# Altium PCB Brojilo_zaslon.PcbDoc
Units mm, origin at the board's own origin, x right, y up, seen from the top; angles counter-clockwise.
Board outline 113 x 60 mm, 2 copper layers (Top Layer, Bottom Layer); 32 components, 61 nets, 227 pads, 0 vias.
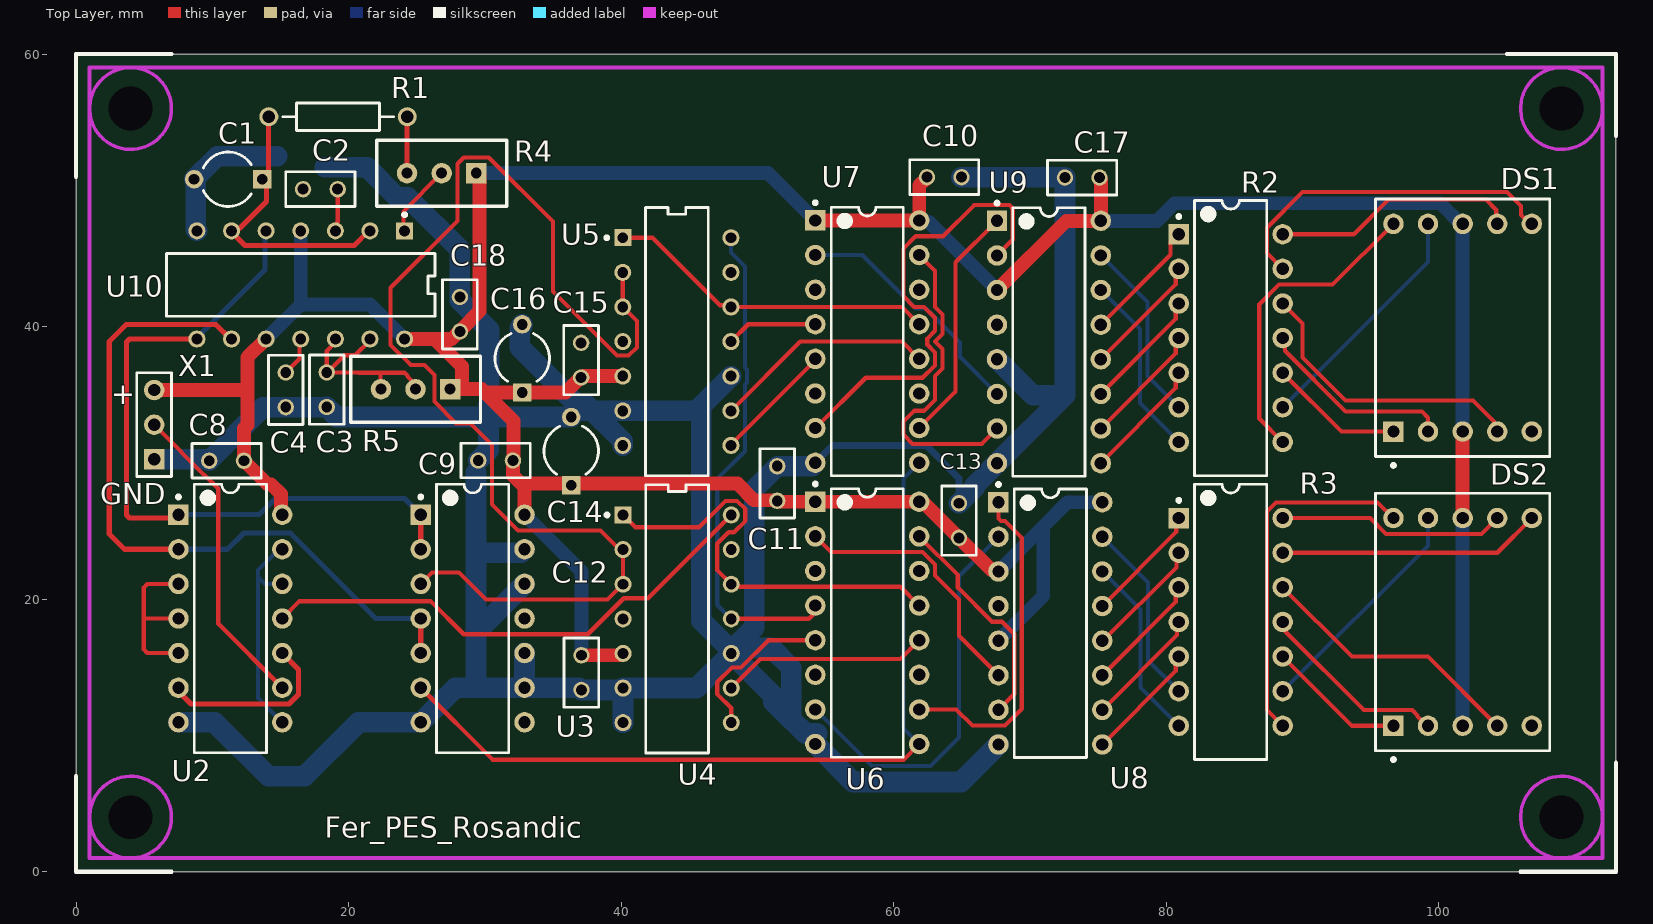
[diagram p0: Top Layer view]
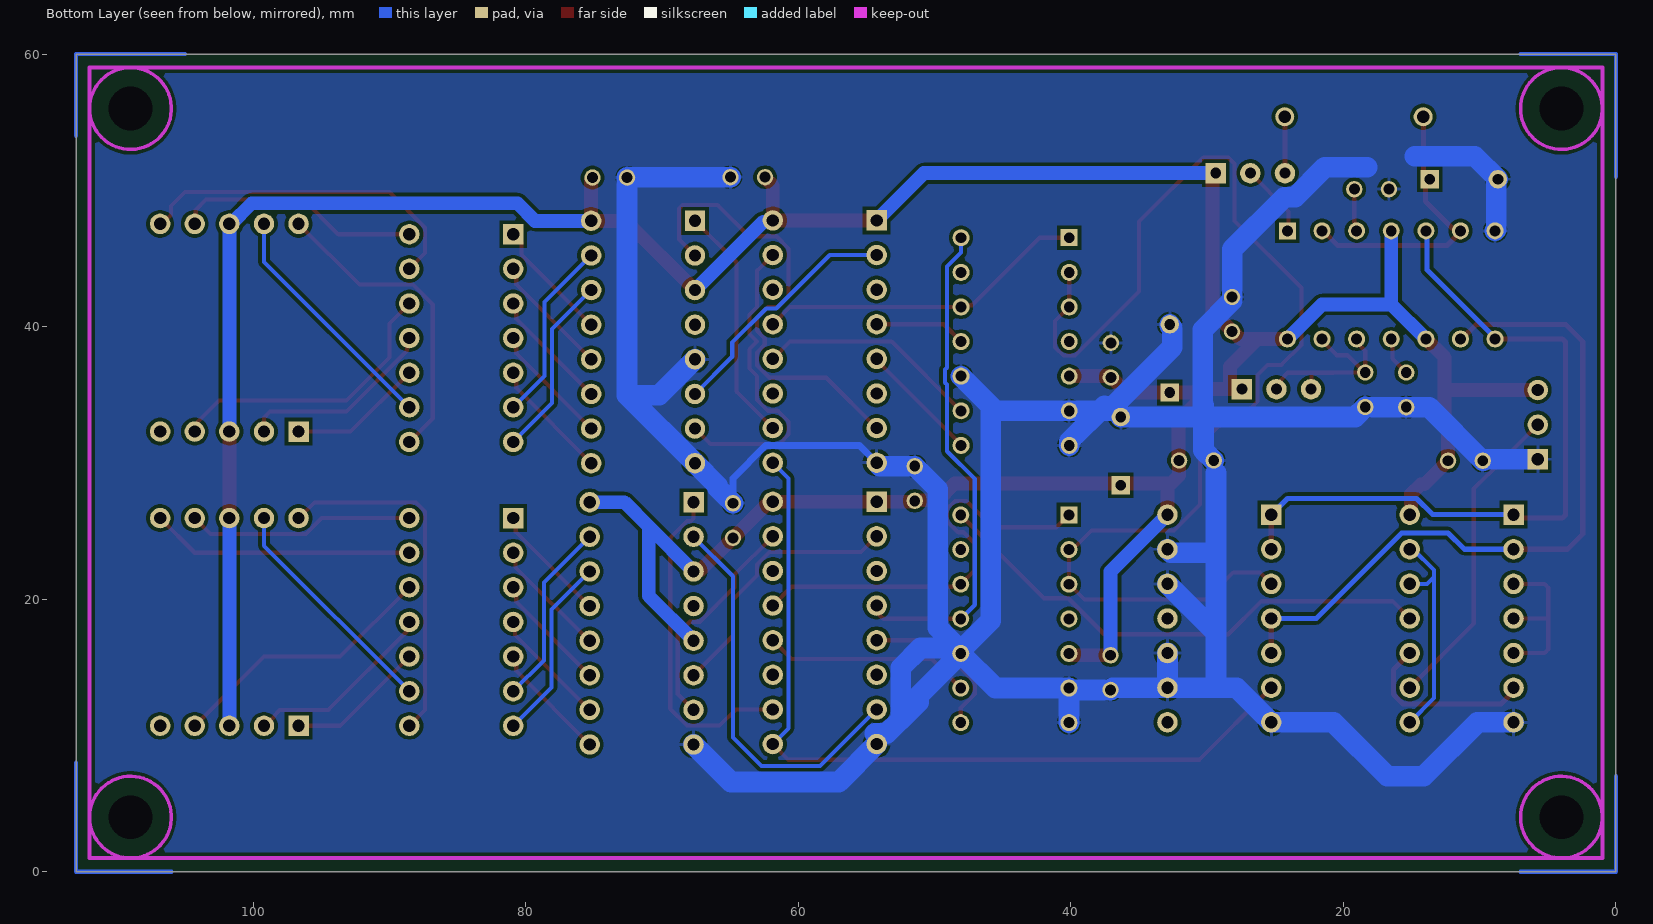
[diagram p1: Bottom Layer view, seen from below]

## Layer stack, top to bottom
Top Solder: solder mask 0.0102, Solder Resist, Dk 3.5
Top Layer: signal copper 0.0356
Dielectric 1: dielectric 0.32, FR-4, Dk 4.8
Bottom Layer: signal copper 0.0356
Bottom Solder: solder mask 0.0102, Solder Resist, Dk 3.5

## Board outline
0,0 0,60 113,60 113,0

## Design rules (kind name [scope] priority, off if disabled: settings)
Clearance [All] p1: gap=0.254 ignorepadtopadclearanceinfootprint=FALSE
HoleSize [All] p1: absolutevalues=TRUE maxlimit=3.2 minlimit=0.5 maxpercent=80.000 minpercent=20.000
PolygonConnect [All] p1: thpad.connectstyle=Relief thpad.reliefconductorwidth=0.254 thpad.reliefentries=4 thpad.polygonreliefangle="90 Angle" thpad.airgapwidth=0.254 smdpad.connectstyle=Relief smdpad.reliefconductorwidth=0.254 smdpad.reliefentries=4 smdpad.polygonreliefangle="90 Angle" smdpad.airgapwidth=0.254 via.connectstyle=Direct via.reliefconductorwidth=0.254 via.reliefentries=4 via.polygonreliefangle="90 Angle" via.airgapwidth=0.254
RoutingVias [All] p1: holewidth=0.5 width=0.7 viastyle="Through Hole" minholewidth=0.5 minwidth=0.7 maxholewidth=0.5 maxwidth=0.7
SilkToSolderMaskClearance SilkToSolderMaskClearance_1 [IsPad] p1: minsilkscreentomaskgap=0.203 clearancetoexposedcopper=TRUE
SilkToSolderMaskClearance [All] p2: minsilkscreentomaskgap=0.254 clearancetoexposedcopper=TRUE
SolderMaskExpansion [All] p1: expansion=0.102 istentingtop=FALSE
SupplyNets "Schematic Supply Nets_1" [InNet('GND')] p1: voltage=0.000
SupplyNets "Schematic Supply Nets" [InNet('+5V')] p2: voltage=0.000
Width [All] p1: maxlimit=1.524 minlimit=0.254 preferedwidth=0.305
28 further rules are at their usual default settings.

## Components (designator, comment, footprint, x,y, rotation, side; value= is the part's Value field where it differs from the comment)
C1 "10u/16V" CAPR5-4x5 11.168,50.812 r180 top
C2 "10n" RAD-0.1 17.931,50.082 r0 top
C3 "0.47u" RAD-0.1 18.4,35.369 r270 top
C4 "10n" RAD-0.1 15.392,35.357 r90 top
C8 "100n" RAD-0.1 11.049,30.154 r0 top
C9 "100n" RAD-0.1 30.785,30.175 r0 top
C10 "100n" RAD-0.1 63.708,50.964 r180 top
C11 "100n" RAD-0.1 51.456,28.486 r270 top
C12 "100n" RAD-0.1 37.085,14.611 r90 top
C13 "100n" RAD-0.1 64.791,25.768 r270 top
C14 "10u/10V" CAPR5-4x5 36.336,30.858 r90 top
C15 "100n" RAD-0.1 37.066,37.537 r270 top
C16 "10u/10V" CAPR5-4x5 32.742,37.666 r90 top
C17 "100n" RAD-0.1 73.832,50.932 r0 top
C18 "100n" RAD-0.1 28.166,40.903 r270 top
DS1 "LT542" H 101.748,39.916 r0 top
DS2 "LT542" H 101.748,18.326 r0 top
R1 "Res2" AXIAL-0.4 19.228,55.397 r0 top
R2 "330" DIP-14 84.73,39.154 r0 top
R3 "330" DIP-14 84.73,18.326 r0 top
R4 "100k" TRIMER 26.829,51.259 r180 top
R5 "100M" TRIMER 24.916,35.41 r180 top
U2 "SN74LS00N" N0014A 11.324,18.58 r0 top
U3 "SN74LS00N" N0014A 29.104,18.58 r0 top
U4 "SN74LS90N" FP-N0014A-MFG 44.109,18.556 r0 top
U5 "SN74LS90N" FP-N0014A-MFG 44.09,38.9 r0 top
U6 "SN74LS175N" N0016A 58.06,18.256 r0 top
U7 "SN74LS175N" N0016A 58.06,38.9 r0 top
U8 "SN7447AN" N0016A 71.497,18.224 r0 top
U9 "SN7447AN" N0016A 71.392,38.868 r0 top
U10 "TLC556IN" FP-N0014A-MFG 16.49,43.058 r270 top
X1 "" HDR1X3 5.736,30.264 r90 top

## Footprints (in the part's own frame and the unit in brackets; to place one, negate y for a bottom-side part, rotate by r counter-clockwise, add the part's x,y. Pads: shape width x height; smd on the part's side, far side on the other; paste and mask are expansions set on the pad)
AXIAL-0.4 [mm] "Axial Device, Thru-Hole; 2 Leads; 0.4 in Pin Spacing"
  round 1.4 hole 0.9: 1(-5.08,0) 2(5.08,0)
  silkscreen extent -4.06,-1.02 4.06,1.02
CAPR5-4x5 [mm] "Capacitor; 2 Leads"
  rect 1.35x1.35 hole 0.8: 1(-2.5,0)
  round 1.35 hole 0.8: 2(2.5,0)
  silkscreen extent -1.69,-2 1.82,2
DIP-14 [mm] "DIP; 14 Leads; Row Spacing 7.62 mm; Pitch 2.54 mm"
  rect 1.5x1.5 hole 0.9: 1(-3.81,7.62)
  round 1.5 hole 0.9: 2(-3.81,5.08) 3(-3.81,2.54) 4(-3.81,0) 5(-3.81,-2.54) 6(-3.81,-5.08) 7(-3.81,-7.62) 8(3.81,-7.62) 9(3.81,-5.08) 10(3.81,-2.54) 11(3.81,0) 12(3.81,2.54) 13(3.81,5.08) 14(3.81,7.62)
  silkscreen extent -3.93,-10.1 2.65,10.1, body extent -3.6,-10.1 3.6,10.1, height 5.08
FP-N0014A-MFG [mm]
  rect 1.25x1.25 hole 0.8 paste-2539.97 mask+0: 1(-3.97,7.62)
  round 1.25 hole 0.8 paste-2539.97 mask+0: 2(-3.97,5.08) 3(-3.97,2.54) 4(-3.97,0) 5(-3.97,-2.54) 6(-3.97,-5.08) 7(-3.97,-7.62) 8(3.97,-7.62) 9(3.97,-5.08) 10(3.97,-2.54) 11(3.97,0) 12(3.97,2.54) 13(3.97,5.08) 14(3.97,7.62)
  silkscreen extent -5.27,-9.84 2.3,9.84, body extent -4.69,-9.94 4.69,9.94, height 0.25
H [mm] "LED, 7-Segment Display, 14.2 mm, RHD; 10 Leads; Row Space 15.24 mm; Pitch 2.54 mm"
  rect 1.5x1.5 hole 0.9: 1(-5.08,-7.62)
  round 1.5 hole 0.9: 2(-2.54,-7.62) 3(0,-7.62) 4(2.54,-7.62) 5(5.08,-7.62) 6(5.08,7.62) 7(2.54,7.62) 8(0,7.62) 9(-2.54,7.62) 10(-5.08,7.62)
  silkscreen extent -6.4,-10.22 6.4,9.45, body extent -6.4,-9.45 6.4,9.45, height 8.25
HDR1X3 [mm] "Connector; Header; 3 Position"
  rect 1.5x1.5 hole 0.9: 1(0,0)
  round 1.5 hole 0.9: 2(2.54,0) 3(5.08,0)
  silkscreen extent -1.27,-1.27 6.35,1.27
N0014A [mm] "DIP, 14-Leads, Body 19.7x6.6mm, Pitch 2.54mm"
  rect 1.5x1.5 hole 0.9: 1(-3.81,7.62)
  round 1.5 hole 0.9: 2(-3.81,5.08) 3(-3.81,2.54) 4(-3.81,0) 5(-3.81,-2.54) 6(-3.81,-5.08) 7(-3.81,-7.62) 8(3.81,-7.62) 9(3.81,-5.08) 10(3.81,-2.54) 11(3.81,0) 12(3.81,2.54) 13(3.81,5.08) 14(3.81,7.62)
  silkscreen extent -3.93,-9.85 2.65,9.85, body extent -3.95,-9.85 3.95,9.85, height 5.08
N0016A [mm] "DIP, 16-Leads, Body 19.7x6.6mm, Pitch 2.54mm"
  rect 1.5x1.5 hole 0.9: 1(-3.81,8.89)
  round 1.5 hole 0.9: 2(-3.81,6.35) 3(-3.81,3.81) 4(-3.81,1.27) 5(-3.81,-1.27) 6(-3.81,-3.81) 7(-3.81,-6.35) 8(-3.81,-8.89) 9(3.81,-8.89) 10(3.81,-6.35) 11(3.81,-3.81) 12(3.81,-1.27) 13(3.81,1.27) 14(3.81,3.81) 15(3.81,6.35) 16(3.81,8.89)
  silkscreen extent -3.93,-9.85 2.65,10.31, body extent -3.95,-9.85 3.95,9.85, height 5.08
RAD-0.1 [mm] "Radial Cap, Thru-Hole; 2 Leads; 0.1 in Pin Spacing"
  round 1.2 hole 0.8: 1(-1.27,0) 2(1.27,0)
  silkscreen extent -2.54,-1.27 2.54,1.27
TRIMER [mm]
  rect 1.5x1.5 hole 0.8: 1(-2.54,0)
  round 1.5 hole 0.8: 2(0,0) 3(2.54,0)
  silkscreen extent -4.77,-2.41 4.76,2.42

## Part data
C1 C14 C16: library part Elko, Dobavljac=DigiKey
  C1: Cijena=€0,34, Kataloški broj=P14391-ND, Kućište="10x12.5mm; 2 izvoda; pitch 5.0mm; žičani izvodi", Opis="Elektrolitski kondenzator 10u/16V", Proizvođač="Panasonic Electronic Components", Vrijednost=10u/16V
  C14 C16: Cijena=€0,18, Kataloški broj=399-ESK106M010AC3AA-ND, Kućište="5x11mm; 2 izvoda; pitch 2.0mm; žičani izvodi", Opis="Elektrolitski kondenzator 10u/10V", Proizvođač=KEMET, Vrijednost=10u/10V
C2 C3 C4 C8 C9 C10 C11 C12 C13 C15 C17 C18: library part Cap, "Capacitor", Dobavljac=DigiKey, PackageReference=RAD-0.3
  C2 C4: Cijena=€0,21, Kataloški broj=BC5134-ND, Kućište="2.3x4.0mm; 2 izvoda; pitch 5.0mm; žičani izvodi", Opis="Keramički kondenzator 0.01uF", Proizvođač="Vishay Beyschlag/Draloric/BC Components", Vrijednost=0.01uF
  C3: Cijena=€0,18, Kataloški broj=445-173587-3-ND, Kućište=0805, Opis="Keramički kondenzator 0.47uF", Proizvođač=TDK, Vrijednost=0.47uF
  C8 C9 C10 C11 C12 C13 C15 C17 C18: Cijena=€0,23, Kataloški broj=BC3324-ND, Kućište="2.3x6.0mm; 2 izvoda; pitch 7.5mm; žičani izvodi", Opis="Keramički kondenzator 100nF", Proizvođač="Vishay Beyschlag/Draloric/BC Components", Vrijednost=100nF
DS1 DS2: library part "Dpy Blue-CA", "14.2 mm General Purpose Blue 7-Segment Display: CA, RH DP, Gray Surface", Cijena=€1,90, Dobavljac=DigiKey, Kataloški broj=754-2281-ND, Kućište=0603, Opis="7-segmentni zaslon", Proizvođač=Kingbright
R1: "Resistor", Cijena=€0,09, Dobavljac=DigiKey, Kataloški broj=1.00KXBK-ND, Kućište="2.5x6.8mm; 2 izvoda; pitch 10mm; žičani izvodi", Opis="Otpornik 1kOhm", PackageReference=AXIAL-0.4, Proizvođač=YAGEO, Vrijednost=1k
R2 R3: library part "Res Pack4", "Isolated Resistor Network", Cijena=€3,37, Dobavljac=DigiKey, Kataloški broj=4114R-1-331LF-ND, Kućište=DIP-14, Opis="Mreža 7 otpornika 330 Ohm", Proizvođač="Bourns Inc."
R4 R5: library part Trimer, Dobavljac=DigiKey
  R4: Cijena=€3,09, Kataloški broj=3296W-104-ND, Kućište="9.53x4.83x10.03mm; 3 izvoda; pitch 2.54mm; žičani izvodi", Opis="Trimer 100kOhm", Proizvođač="Bourns Inc."
U2 U3: library part CMP-1627-00476-2, "Quad 2-input positive-NAND gates, N0014A, TUBE", Cijena=€0,66, Dobavljac=DigiKey, Kataloški broj=296-1626-ND, Kućište=SOIC-14, Opis="Četverostruka NI (NAND) vrata", Proizvođač="Texas Instruments"
U4 U5: library part SN74LS90, "IC DECADE COUNTER 14-DIP", Cijena=€3,03, Dobavljac=DigiKey, Kataloški broj=296-34031-5-ND, Kućište=SOIC-14, Opis="Dekadsko brojilo", Proizvođač="Texas Instruments"
U6 U7: library part CMP-1616-00100-3, "Quadruple D-Type Flip-Flops With Clear, N0016A, TUBE", Cijena=€1,03, Dobavljac=DigiKey, Kataloški broj=296-1648-5-ND, Kućište=SOIC-16, Opis="4-bitni D flip-flop registar s resetom", Proizvođač="Texas Instruments"
U8 U9: "BCD-to-7-Segment Decoder / Driver, 4.75 to 5.25 V, 0 to 70 degC, 16-pin DIP (N16), Pb-Free (RoHS)", Cijena=€3,83, Dobavljac=DigiKey, Kataloški broj=296-33612-5-ND, Kućište=SOIC-16, Opis="BCD u 7-segmentni dekoder", Proizvođač="Texas Instruments"
U10: "IC OSC TIMER DUAL 2.1MHZ 14-DIP", Cijena=€1,51, Dobavljac=DigiKey, Kataloški broj=296-10344-5-ND, Kućište=SOIC-16, Opis="Sklop za upravljanje vremenom", Proizvođač="Texas Instruments"
X1: library part "Header 3", "Header, 3-Pin", Cijena=€0,28, Dobavljac=DigiKey, Kataloški broj=S1011EC-03-ND, Kućište="7.62x2.54mm; 3 izvoda; pitch 2.54mm; žičani izvodi", Opis="3-pinski konektor", Proizvođač="Sullins Connector Solutions"

## Free pads (board coordinates)
  round 3 hole 3.2 unplated: 0(4,4) 0(4,56) 0(109,4) 0(109,56)

## Nets (pads, with @x,y where several pads share a name; then routed paths per layer and width w, separated by ;. In a path a pad name is that pad's centre, name@x,y a point inside that pad or via, vN(x,y) a via of type N, cw(c..) or ccw(c..) an arc to the next point about the centre after c; other vN are vias at no path point)
+5V: C8.2 C9.2 C10.2 C11.2 C12.2 C13.2 C14.1 C15.2 C16.1 C17.2 C18.2 DS1.3 DS1.8 DS2.3 DS2.8 R4.1 R5.1 U2.14 U3.14 U4.5 U5.5 U6.1 U6.16 U7.1 U7.16 U8.3 U8.5 U8.16 U9.3 U9.16 U10.4 U10.10 U10.14 X1.3 | length 278.7
  Top Layer w1.016: X1.3 12.594,35.344 ; U10.10 13.927,39.088 12.594,37.755 12.594,35.344 ; U2.14 15.041,26.293 15.041,27.707 14.318,28.43 14.042,28.43 C8.2 12.319,32.511 12.594,32.786 12.594,35.344 ; U10.14 26.292,39.088 ; R5.1 28.317,35.41 ; R4.1 29.611,51.017 29.611,41.128 28.166,39.683 C18.2 28.116,39.633 27.571,39.088 26.292,39.088 ; U3.14@32.914,26.27 32.914,28.473 ; C15.2 37.016,36.267 35.915,35.166 C16.1 30.011,35.166 ; C12.2 39.941,15.881 40.076,16.016 U4.5 ; C15.2@37.116,36.267 37.214,36.366 40.012,36.366 U5.5@40.012,36.36 ; U7.1 U7.16 61.87,50.346 62.438,50.914 C10.2 ; U9.3 72.662,47.758 U9.16 75.202,50.783 75.102,50.883 C17.2 ; U8.3 67.594,22.127 67.162,22.127 C13.2 62.236,27.053 61.963,27.053 U6.16 U6.1 51.576,27.146 51.506,27.216 C11.2 51.421,27.251 49.756,27.251 48.534,28.473 36.336,28.473 32.914,28.473 ; DS2.8 DS1.3 ; 26.292,39.088 28.317,37.064 28.317,35.41 ; 28.317,35.41 29.767,35.41 30.011,35.166 ; 30.011,35.166 32.09,33.086 32.09,30.21 C9.2 32.055,29.069 32.65,28.473 32.914,28.473
  Bottom Layer w1.016: U10.10 16.49,41.628 ; U10.4 16.49,41.628 ; U10.14 21.57,41.628 16.49,41.628 ; R4.1 50.781,51.259 U7.1 ; U3.14 37.085,22.029 C12.2 ; U7.16 61.963,47.697 62.563,47.697 U9.3 ; U8.5 70.976,20.244 ; U8.3 70.976,25.324 ; 70.934,20.286 70.976,20.244 ; U9.16 79.327,47.758 80.616,49.048 100.105,49.048 101.617,47.536 DS1.8 DS1.3 ; U8.16 72.767,27.114 70.976,25.324 ; DS2.3 DS2.8 ; 70.976,20.244 70.976,25.324
CLK: U3.6 U6.9 U7.9 | length 60.8
  Top Layer w0.305: U3.6 30.584,8.21 60.714,8.21 U6.9
  Bottom Layer w0.305: U6.9 60.714,10.522 60.714,28.854 U7.9
CLKA: U4.11 U5.14 U6.4 | length 36.6
  Top Layer w0.305: U4.11 53.765,18.556 54.021,18.812 54.021,19.297 U6.4
  Bottom Layer w0.305: U5.14 48.061,45.438 49.091,44.407 49.091,36.981 49.228,36.844 49.228,35.876 49.091,35.739 49.091,30.853 47.048,28.809 47.048,19.587 U4.11
GateOut: U2.11 U4.14 | length 38.1
  Top Layer w0.305: U2.11 16.404,19.85 26.023,19.85 28.45,17.424 37.548,17.424 40.189,20.065 41.968,20.065 U4.14
GND: C1.2 C2.1 C3.2 C4.1 C8.1 C9.1 C10.1 C11.1 C12.1 C13.1 C14.2 C15.1 C16.2 C17.1 C18.1 U2.7 U3.7 U3.9 U3.10 U3.12 U3.13 U4.6 U4.7 U4.10 U5.6 U5.7 U5.10 U6.8 U7.8 U8.8 U9.5 U9.8 U10.7 X1.1 | length 297.2
  Bottom Layer w0.508: U7.8 55.508,31.268 62.391,31.268 64.791,28.868 C13.1
  Bottom Layer w1.524: X1.1 9.615,30.264 9.725,30.154 C8.1 13.712,34.087 C4.1 17.389,34.087 17.402,34.074 18.375,34.074 C3.2 19.14,33.358 30.257,33.358 ; U2.7 10.161,10.96 14.115,7.006 16.762,7.006 20.716,10.96 U3.7 27.834,13.5 29.358,13.5 ; U10.7 8.784,47.114 8.784,50.696 C1.2 10.359,52.503 14.764,52.503 ; 18.277,51.698 21.352,51.698 23.557,49.493 24.332,49.493 28.166,45.659 C18.1 28.166,41.918 30.325,39.76 30.325,34.301 30.257,34.234 30.257,33.358 ; 29.358,29.255 29.358,23.409 ; C9.1 30.257,30.918 30.257,33.358 ; 29.515,33.358 C14.2 ; C16.2 32.742,40.082 32.553,39.893 32.553,38.495 37.17,33.878 37.17,33.82 U5.6 45.52,33.82 46.115,34.415 U5.10 ; U3.10 U3.9 ; U3.12 29.358,17.564 ; U3.13 32.663,23.409 29.358,23.409 ; 37.527,34.177 40.12,31.584 U5.7 ; U4.7 U4.6 ; 45.88,33.82 45.88,18.435 47.892,16.422 51.03,16.422 52.484,14.968 52.484,11.174 53.519,10.14 54.364,10.14 ; 52.463,11.153 51.165,12.451 51.165,12.931 U4.10 ; U7.8@53.996,29.756 C11.1 49.768,28.068 49.768,17.924 48.079,16.235 U4.10 ; U6.8 57.025,6.591 64.943,6.591 U8.8 ; C13.1 65.921,28.168 65.921,28.317 U9.8 72.562,34.959 ; C10.1 72.531,50.964 C17.1 72.562,34.959 ; U9.5 70.222,34.959 72.562,34.959 ; 29.358,13.5 29.358,17.564 ; 29.358,13.5 U3.9 ; 29.358,17.564 29.358,23.409 ; U3.9 36.926,13.5 C12.1 40.004,13.341 U4.6 ; U4.6 45.539,13.476 U4.10
NetC1_1: C1.1 R1.1 U10.2 U10.6 | length 21.1
  Top Layer w0.381: R1.1@14.118,55.41 14.118,51.262 C1.1 13.988,50.492 13.988,49.184 11.998,47.194 11.576,47.194 U10.6 11.41,46.942 12.394,45.959 20.415,45.959 21.484,47.028 U10.2
NetC2_2: C2.2 U10.3 | length 3.1
  Top Layer w0.305: U10.3 19.125,47.123 19.125,47.603 19.201,47.679 C2.2
NetC3_1: C3.1 R5.2 R5.3 U10.12 U10.13 | length 15.4
  Top Layer w0.305: U10.12 19.03,38.832 18.4,38.202 C3.1 ; U10.13 21.57,38.98 20.485,37.895 19.693,37.895 18.438,36.639 C3.1 ; R5.3 22.337,35.449 22.337,36.614 ; R5.2 24.916,35.733 24.316,36.333 24.316,36.398 24.1,36.614 22.337,36.614 ; C3.1 20.73,36.639 20.755,36.614 22.337,36.614
NetC4_2: C4.2 U10.11 | length 2.9
  Top Layer w0.305: C4.2 16.404,37.638 16.404,39.002 U10.11
NetDS1_1: DS1.1 R2.10 | length 9.9
  Top Layer w0.305: R2.10 92.858,32.296 DS1.1
NetDS1_2: DS1.2 R2.11 | length 14.6
  Top Layer w0.305: R2.11 88.708,38.986 88.708,38.224 93.167,33.765 98.755,33.765 99.208,33.312 DS1.2
NetDS1_4: DS1.4 R2.12 | length 21.4
  Top Layer w0.305: R2.12 90,40.234 90,37.722 93.14,34.582 102.51,34.582 104.059,33.033 104.059,32.525 DS1.4
NetDS1_6: DS1.6 R2.13 | length 25.4
  Top Layer w0.305: R2.13 87.384,45.39 87.384,47.253 90.003,49.873 104.999,49.873 106.028,48.844 106.028,48.189 106.681,47.536 DS1.6
NetDS1_7: DS1.7 R2.14 | length 18.1
  Top Layer w0.305: R2.14 93.763,46.774 96.303,49.314 103.459,49.314 104.214,48.559 104.214,47.61 DS1.7
NetDS1_9: DS1.9 R2.9 | length 17.9
  Bottom Layer w0.305: R2.9 99.208,44.742 DS1.9
NetDS1_10: DS1.10 R2.8 | length 23.1
  Top Layer w0.305: R2.8 86.825,33.249 86.825,41.614 88.288,43.078 92.21,43.078 DS1.10
NetDS2_1: DS2.1 R3.10 | length 10.2
  Top Layer w0.305: R3.10 93.62,10.706 DS2.1
NetDS2_2: DS2.2 R3.11 | length 14.2
  Top Layer w0.305: R3.11 88.769,18.097 88.769,17.589 94.496,11.862 98.052,11.862 98.446,11.468 98.446,11.399 99.139,10.706 DS2.2
NetDS2_4: DS2.4 R3.12 | length 20
  Top Layer w0.305: R3.12 93.62,15.786 99.208,15.786 DS2.4
NetDS2_6: DS2.6 R3.13 | length 19.3
  Top Layer w0.305: R3.13 104.288,23.406 DS2.6
NetDS2_7: DS2.7 R3.14 | length 16.7
  Top Layer w0.305: R3.14 94.967,25.946 96.123,24.79 103.132,24.79 DS2.7
NetDS2_9: DS2.9 R3.9 | length 17.1
  Bottom Layer w0.305: R3.9 99.208,23.914 DS2.9
NetDS2_10: DS2.10 R3.8 | length 26.2
  Top Layer w0.305: R3.8 87.384,11.862 87.384,26.425 88.061,27.102 95.512,27.102 DS2.10
NetR1_2: R1.2 R4.3 | length 4.1
  Top Layer w0.381: R4.3 R1.2@24.289,55.399
NetR2_1: R2.1 U9.13 | length 9
  Top Layer w0.305: U9.13 75.202,40.151 80.322,45.272 80.322,46.176 R2.1
NetR2_2: R2.2 U9.12 | length 9
  Top Layer w0.305: U9.12 75.202,37.611 80.691,43.101 80.691,44.005 R2.2
NetR2_3: R2.3 U9.11 | length 9
  Top Layer w0.305: U9.11 75.202,35.071 80.691,40.561 80.691,41.465 R2.3
NetR2_4: R2.4 U9.10 | length 9
  Top Layer w0.305: U9.10 75.202,32.531 80.691,38.021 80.691,38.925 R2.4
NetR2_5: R2.5 U9.9 | length 9
  Top Layer w0.305: U9.9 75.202,29.991 80.691,35.481 80.691,36.385 R2.5
NetR2_6: R2.6 U9.15 | length 13.5
  Bottom Layer w0.305: U9.15 78.62,41.801 78.62,36.374 R2.6
NetR2_7: R2.7 U9.14 | length 13.5
  Bottom Layer w0.305: U9.14 78.061,39.819 78.061,34.393 R2.7
NetR3_1: R3.1 U8.13 | length 8.8
  Top Layer w0.305: U8.13 80.73,24.917 80.73,25.756 R3.1
NetR3_2: R3.2 U8.12 | length 8.8
  Top Layer w0.305: U8.12 75.373,16.954 80.752,22.334 80.752,23.238 R3.2
NetR3_3: R3.3 U8.11 | length 8.8
  Top Layer w0.305: U8.11 80.691,19.799 80.691,20.637 R3.3
NetR3_4: R3.4 U8.10 | length 8.8
  Top Layer w0.305: U8.10 80.79,17.358 80.79,18.196 R3.4
NetR3_5: R3.5 U8.9 | length 8.8
  Top Layer w0.305: U8.9 80.691,14.719 80.691,15.557 R3.5
NetR3_6: R3.6 U8.15 | length 13.7
  Bottom Layer w0.305: U8.15 78.672,21.209 78.672,15.494 R3.6
NetR3_7: R3.7 U8.14 | length 13.7
  Bottom Layer w0.305: U8.14 78.113,19.228 78.113,13.513 R3.7
NetR4_2: R4.2 U10.1 | length 5.4
  Top Layer w0.305: U10.1 24.024,47.114 24.024,48.454 R4.2
NetU2_1: U2.1 U3.1 U3.2 U10.5 U10.8 | length 53.3
  Top Layer w0.381: U2.1 7.26,25.946 3.927,25.946 3.704,26.169 3.704,38.865 3.927,39.088 U10.8 ; U3.2 U3.1
  Bottom Layer w0.381: U2.1 13.445,26.2 14.639,27.395 24.099,27.395 U3.1 ; U10.8 8.87,39.174 13.864,44.168 13.864,46.942 U10.5
NetU2_2: U2.2 U3.4 U3.5 U10.9 | length 53
  Top Layer w0.381: U2.2 3.546,23.66 2.434,24.772 2.434,38.9 3.692,40.158 10.255,40.158 11.324,39.088 U10.9 ; U3.5 U3.4
  Bottom Layer w0.381: U2.2 11.126,23.66 12.32,24.855 15.717,24.855 21.992,18.58 U3.4
NetU2_3: U2.3 U2.4 U2.5 | length 12.4
  Top Layer w0.305: U2.5 5.228,16.04 4.974,16.294 4.974,18.58 ; U2.4 4.974,18.58 ; U2.3 5.228,21.12 4.974,20.866 4.974,18.58
NetU2_6: U2.6 U2.10 | length 13.3
  Top Layer w0.381: U2.6 7.514,13.224 8.433,12.305 15.629,12.305 16.329,13.005 16.329,14.845 U2.10
NetU2_8: U2.8 U2.12 U2.13 | length 16.3
  Bottom Layer w0.305: U2.8 13.356,12.738 13.356,21.628 ; U2.12 13.864,21.12 13.356,21.628 ; U2.13 14.88,23.66 13.356,22.136 13.356,21.628
NetU2_9: U2.9 X1.2 | length 23.2
  Top Layer w0.305: X1.2 7.744,30.796 7.744,30.765 9.362,29.148 9.392,29.148 10.435,28.105 10.435,18.199 U2.9
NetU3_3: U3.3 U4.2 U4.3 U5.2 U5.3 | length 89.9
  Top Layer w0.305: U3.3 26.132,21.958 28.089,21.958 30.083,19.964 39.007,19.964 U4.3 U4.2 39.893,23.636 38.485,25.044 32.435,25.044 30.521,26.957 30.521,31.313 28.932,32.902 27.888,32.902 26.299,34.491 26.299,36.438 25.565,37.173 24.567,37.173 23.079,38.661 23.079,42.852 27.985,47.759 27.985,51.95 28.451,52.415 30.287,52.415 34.99,47.713 34.99,42.571 39.693,37.869 40.547,37.869 41.151,38.473 41.151,40.409 U5.3 U5.2
NetU4_1: U4.1 U4.12 U6.13 | length 31.8
  Top Layer w0.305: U4.1 41.043,25.272 45.717,25.272 47.652,27.207 48.507,27.207 49.111,26.603 49.111,25.749 48.268,24.906 47.891,24.906 47.048,24.063 47.048,22.127 U4.12 ; U4.12 48.262,20.915 48.725,20.915 48.73,20.91 60.486,20.91 U6.13
NetU4_8: U4.8 U6.5 | length 11.9
  Top Layer w0.305: U4.8@48.079,10.937 48.079,12.018 47.048,13.049 47.048,13.903 48.129,14.985 48.798,14.985 50.799,16.986 U6.5
NetU4_9: U4.9 U6.12 | length 15.2
  Top Layer w0.305: U4.9 50.206,15.602 60.486,15.602 U6.12
NetU5_1: U5.1 U5.12 U7.13 | length 24.4
  Top Layer w0.305: U5.1 42.312,46.52 47.266,41.566 47.934,41.566 U5.12 60.6,41.44 U7.13
NetU5_8: U5.8 U7.5 | length 8.9
  Top Layer w0.305: U5.8 48.06,31.36 54.25,37.55 U7.5
NetU5_9: U5.9 U7.12 | length 16.4
  Top Layer w0.305: U5.9 53.14,38.9 60.6,38.9 U7.12
NetU5_11: U5.11 U7.4 | length 6.7
  Top Layer w0.305: U5.11 49.33,40.17 U7.4
NetU6_2: U6.2 U8.6 | length 19.7
  Top Layer w0.305: U6.2 55.406,23.45 62.122,23.45 63.026,22.545 63.026,21.729 64.79,19.965 64.79,17.311 U8.6
NetU6_7: U6.7 U8.2 | length 29.1
  Bottom Layer w0.305: U6.7 58.396,7.76 62.708,7.76 64.79,9.841 64.79,21.678 U8.2
NetU6_10: U6.10 U8.1 | length 24.6
  Top Layer w0.305: U6.10 64.586,11.906 65.774,10.718 68.166,10.718 69.402,11.954 69.402,24.495 68.166,25.731 67.865,25.731 67.687,25.909 U8.1
NetU6_15: U6.15 U8.7 | length 16.5
  Top Layer w0.305: U6.15 64.705,21.771 64.705,20.84 67.208,18.338 67.938,18.338 68.843,17.433 68.843,13.031 U8.7
NetU7_2: U7.2 U9.6 | length 18.2
  Bottom Layer w0.305: U7.2 57.695,45.25 61.618,41.326 62.349,41.326 64.851,38.824 64.851,37.789 U9.6
NetU7_7: U7.7 U9.2 | length 34.5
  Top Layer w0.305: U7.7 57.946,36.246 62.122,36.246 63.026,37.151 63.026,38.109 62.468,38.668 62.468,39.132 63.026,39.691 63.026,40.649 62.235,41.44 61.505,41.44 60.714,42.231 60.714,45.729 61.618,46.634 63.634,46.634 65.915,48.915 68.5,48.915 68.738,48.677 68.738,46.375 U9.2
NetU7_10: U7.10 U9.1 | length 17.6
  Top Layer w0.305: U7.10 64.542,35.222 64.542,44.718 U9.1
NetU7_15: U7.15 U9.7 | length 23.6
  Top Layer w0.305: U7.15 63.026,44.094 63.026,41.439 63.585,40.88 63.585,39.46 63.026,38.901 63.026,38.899 63.585,38.34 63.585,36.92 63.026,36.361 63.026,34.611 62.235,33.82 61.505,33.82 60.714,33.029 60.714,32.071 61.391,31.394 66.457,31.394 U9.7
pads on no net: DS1.5 DS2.5 U3.8 U3.11 U4.4 U4.13 U5.4 U5.13 U6.3 U6.6 U6.11 U6.14 U7.3 U7.6 U7.11 U7.14 U8.4 U9.4
copper on no net: | length 117.7
  Top Layer w0.254: 0,7 0,0.149 0.149,0 7,0 ; 0,51 0,59.851 0.149,60 7,60 ; 105,60 112.851,60 113,59.851 113,54 ; 106,0 112.851,0 113,0.149 113,8
  Bottom Layer w0.305: 0,7 0,0 7,0 ; 0,51 0,60 7,60 ; 105,60 113,60 113,54 ; 106,0 113,0 113,8

## Polygon pours and split planes (outlines as drawn)
GND on Bottom Layer "NONET_L02_P-001" (solid, remove dead copper, pour order 0): 1,59 112,59 112,1 1,1

## Keep-outs
Keep-Out Layer:
  circle w0.254: c109,4 r3
  circle w0.254: c109,56 r3
  circle w0.254: c4,56 r3
  circle w0.254: c4,4 r3
  lines w0.305: 1,1 1,2 1,59 112,59 112,1 3,1 1,1

## Silkscreen, mask and mechanical layers (free items; w line width, h text height)
Top Overlay:
  lines w0.305: 0,7 0,0 7,0 ; 0,51 0,60 7,60 ; 105,60 113,60 113,54 ; 106,0 113,0 113,8
  text "+" at 2.591,34.315 h1.52
  text "GND" at 1.778,26.949 h1.52
  text "Fer_PES_Rosandic" at 18.254,2.508 h1.52
Mechanical 1:
  the board outline again, w0.305
Drill Drawing:
  lines w0.254: -68.837,74.254 -68.837,75.087 -68.004,75.921 -68.837,76.754 -68.837,77.587 -68.004,77.587 -67.171,76.754 -66.337,77.587 -65.504,77.587 -65.504,76.754 -66.337,75.921 -65.504,75.087 -65.504,74.254 -66.337,74.254 -67.171,75.087 -68.004,74.254 -68.837,74.254 ; -68.837,81.754 -65.504,81.754 -65.504,85.087 -68.837,85.087 -68.837,81.754 ; -68.837,90.087 -68.004,90.087 -67.171,89.254 -66.337,90.087 -65.504,90.087 -66.337,90.921 -65.504,91.754 -66.337,91.754 -67.171,92.587 -68.004,91.754 -68.837,91.754 -68.004,90.921 -68.837,90.087
  lines w1: -71.75,72.004 207.348,72.004 ; -71.75,94.504 207.348,94.504 ; -44.993,64.504 -44.993,102.004 ; -15.493,64.504 -15.493,102.004 ; 41.498,64.504 41.498,102.004 ; 66.004,64.504 66.004,102.004 ; 101.907,64.504 101.907,102.004 ; 176.393,64.504 176.393,102.004 ; -71.75,64.504 207.348,64.504 207.348,102.004 -71.75,102.004 -71.75,64.504
  text "Symbol" at -67.25,96.754 h3.6
  text "Count" at -42.743,96.754 h3.6
  text "Hole Size" at -13.243,96.754 h3.6
  text "Plated" at 43.748,96.754 h3.6
  text "Hole Type" at 68.254,96.754 h3.6
  text "Drill Layer Pair" at 104.157,96.754 h3.6
  text "Via/Pad" at 178.643,96.754 h3.6
  text "78" at -42.743,89.254 h3
  text "31.50mil (0.800mm)" at -13.243,89.254 h3
  text "PTH" at 43.748,89.254 h3
  text "Round" at 68.254,89.254 h3
  text "Top Layer - Bottom Layer" at 104.157,89.254 h3
  text "Pad" at 178.643,89.254 h3
  text "145" at -42.743,81.754 h3
  text "35.43mil (0.900mm)" at -13.243,81.754 h3
  text "PTH" at 43.748,81.754 h3
  text "Round" at 68.254,81.754 h3
  text "Top Layer - Bottom Layer" at 104.157,81.754 h3
  text "Pad" at 178.643,81.754 h3
  text "4" at -42.743,74.254 h3
  text "125.98mil (3.200mm)" at -13.243,74.254 h3
  text "NPTH" at 43.748,74.254 h3
  text "Round" at 68.254,74.254 h3
  text "Top Layer - Bottom Layer" at 104.157,74.254 h3
  text "Pad" at 178.643,74.254 h3
  text "227 Total" at -42.743,66.754 h3

## Dimensions
113,60 to 113,0 on Mechanical 1
0,0 to 113,0 on Mechanical 1